# Altium PCB DB31.PcbDoc (part 2 of 8)
Units mil, origin at the board's own origin, x right, y up, seen from the top; angles counter-clockwise.
Board outline 3236.22 x 4456.69 mil, 8 copper layers (Top Layer, MidLayer1, MidLayer2, GND-Layer5, MidLayer3, VCC, MidLayer4, Bottom Layer), stack 61.8 mil thick; 226 components, 469 nets, 1815 pads, 1562 vias.
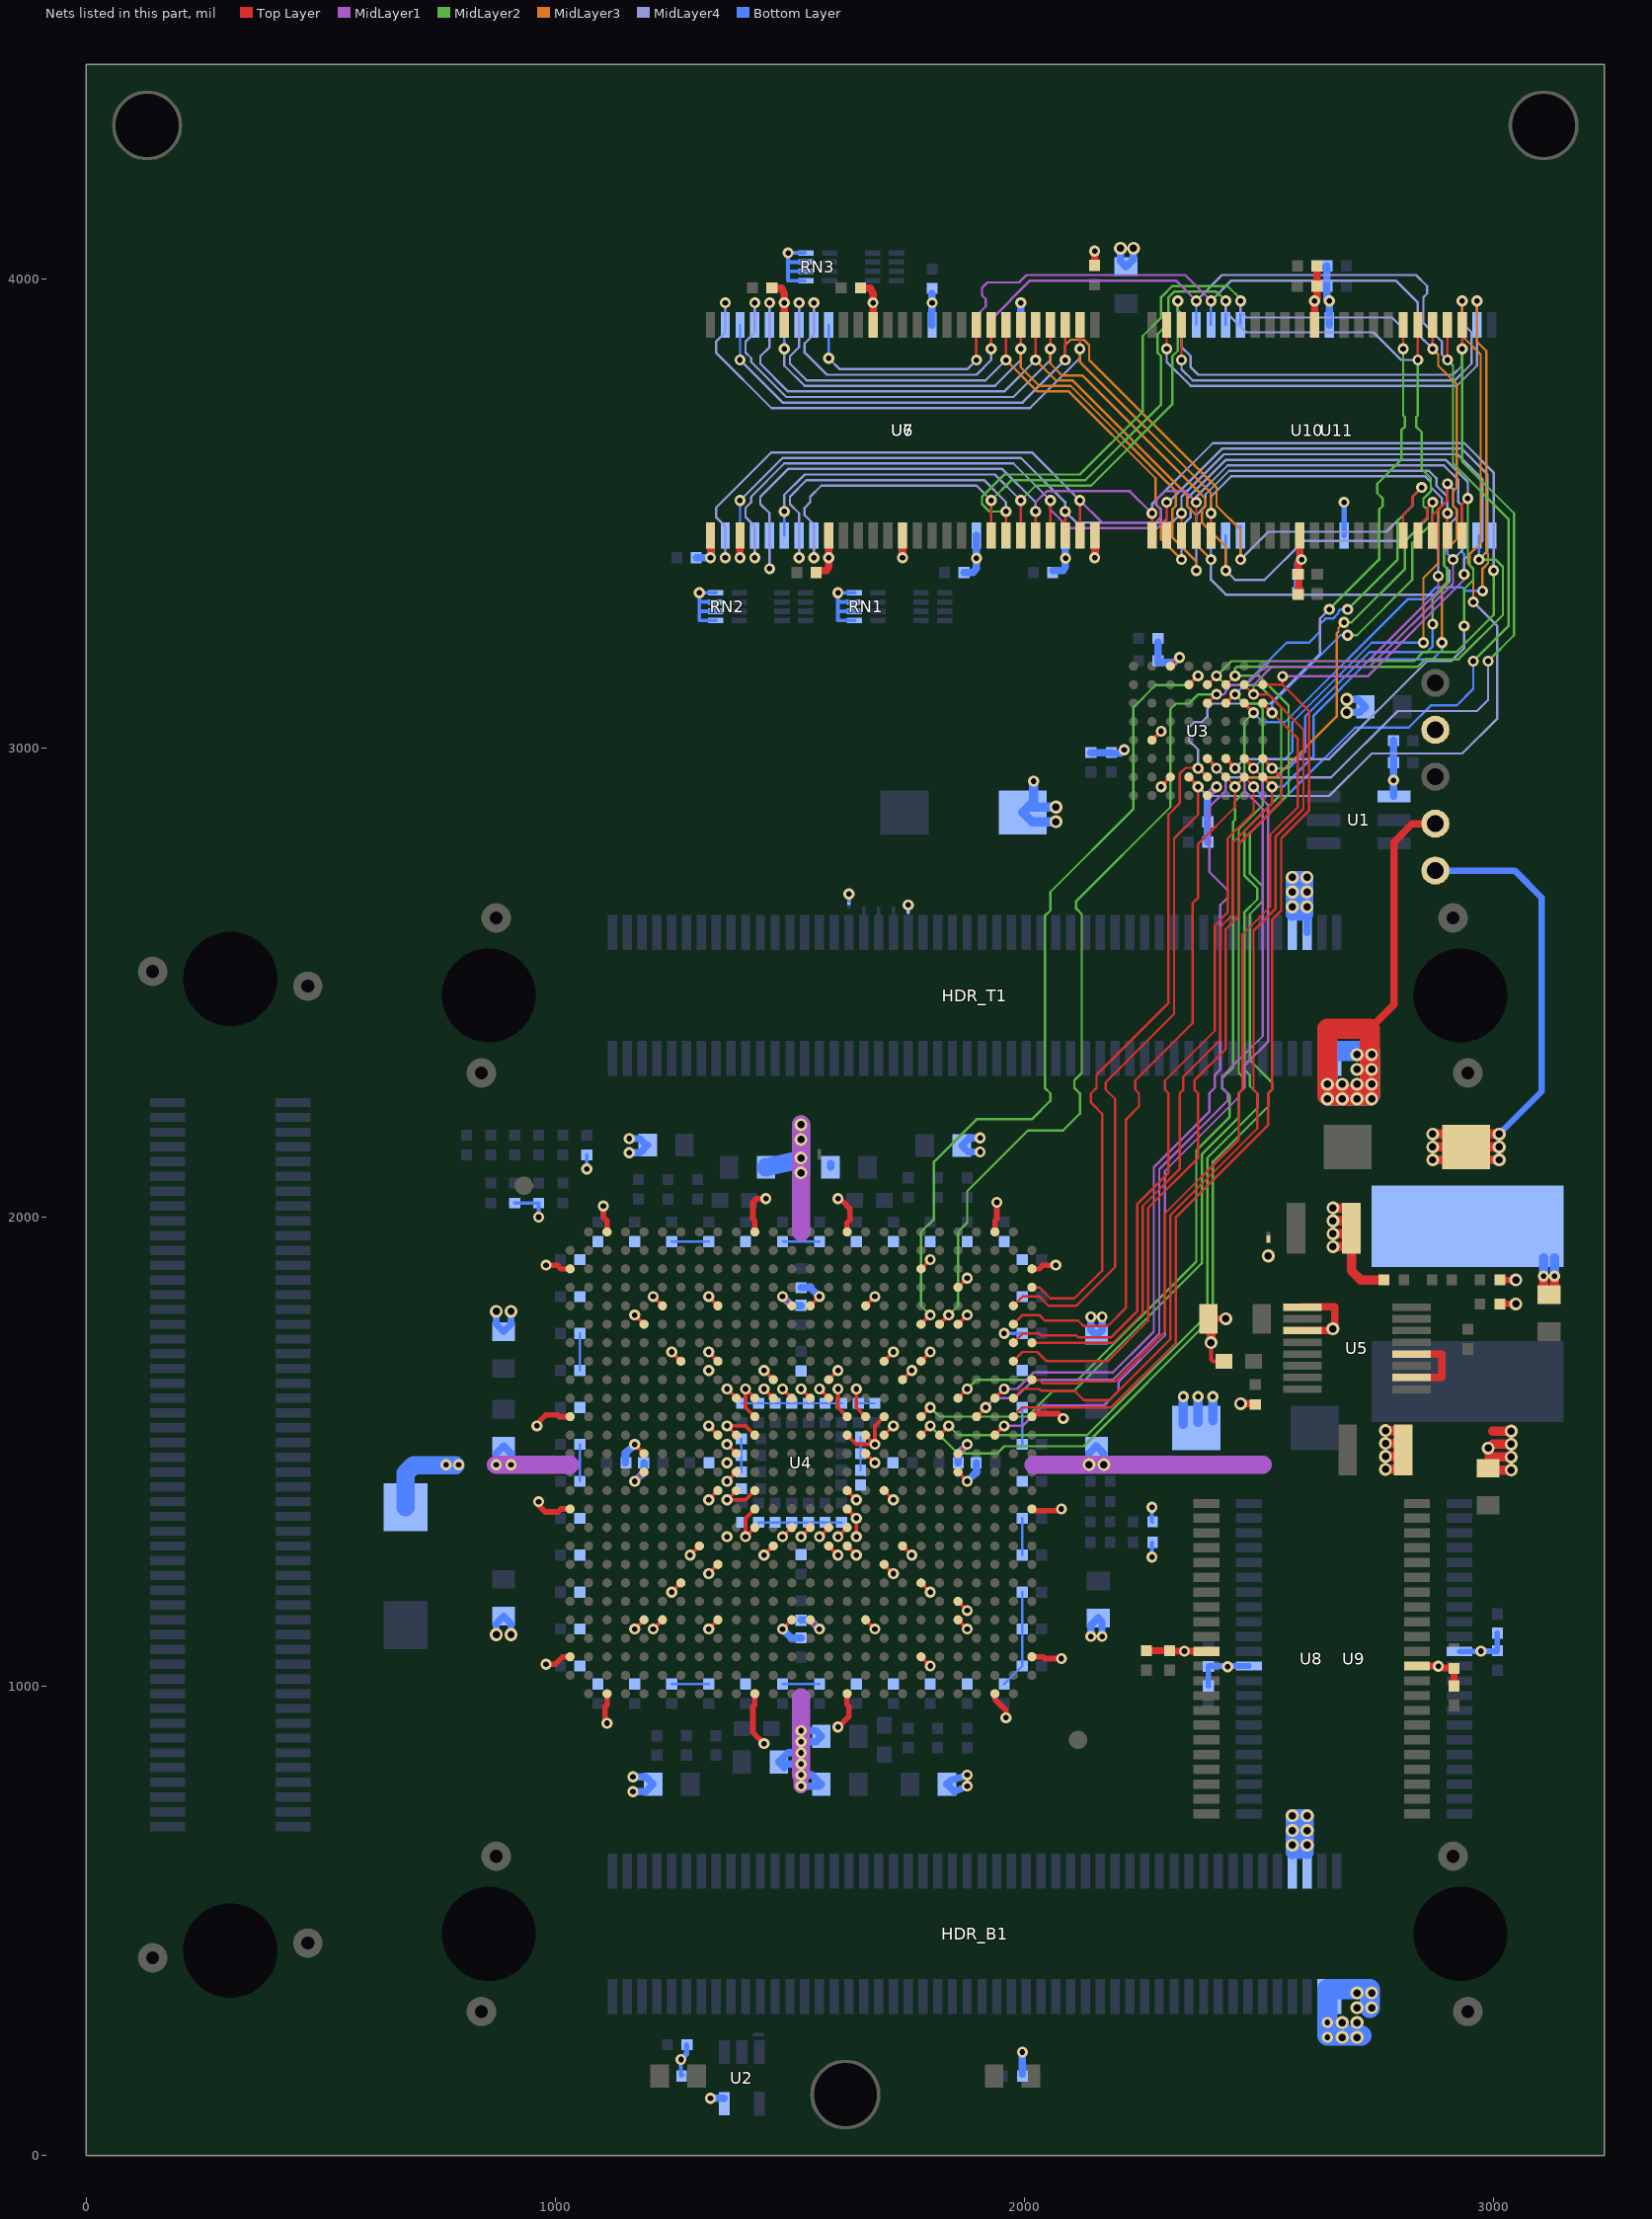
[diagram p8: the nets of this part, all layers, seen from the top]

## Part data
"Altium Logo Bot1" "Altium Logo Top1": library part D-000-0003, "Altium Logo for PCB"
C1 C7 C8 C9 C10 C11 C12 C13 C14 C15 C16 C17 C18 C19 C43 C44 C45 C46 C47 C48 C49 C50 C51 C52 C53 C54 C55 C56 C57 C58 C101 C102 C103 C107 C108 C112 C116 C120 C134 C135 C136 C137 C142 C143 C146 C147 C150 C151 C152 C153: library part D-101-0080, "Capacitor, Ceramic, 0.1uF 10% 16V 0402 (1005) X7R"
C2 C20 C21 C22 C23 C24 C25 C26 C27 C28 C29 C30 C31 C32 C33 C34 C59 C60 C61 C62 C63 C64 C65 C66 C67 C68 C69 C70 C71 C72 C73 C74 C75 C76 C77 C78 C79 C80 C81 C82 C83 C84 C85 C86 C87 C88 C89 C90 C91 C92 C93 C94 C95 C96 C97 C98 C104 C105 C106 C109 C113 C117 C121 C138 C139 C140 C141 C144 C145 C148 C149 C154 C155 C156 C157: library part D-101-0077, "Capacitor, Ceramic, 10nF 10% 16V 0402 (1005) X7R"
C3 C99 C100 C128: library part D-101-0088, "Capacitor, Tantalum, 220uF 10% 10V MCCT-D (7343-31)"
C4 C5 C6 C35 C36 C37 C38 C39 C40 C41 C42 C124 C125 C129 C131: library part D-101-0087, "Capacitor, Ceramic, 10uF 10% 10V 0805 (2012) X5R"
C110 C114 C118 C122: library part D-101-0030, "Capacitor, Ceramic, 1nF 10% 50V 0402 (1005) X7R"
C111 C115 C119 C123 C127: library part D-101-0095, "Capacitor, Ceramic, 2.2uF 10% 10V 0603 (1608) X5R"
C126: library part D-101-0069, "Capacitor, Ceramic, 470pF 5% 50V 0402 (1005) COG"
C130 C132: library part D-101-0021, "Capacitor, Ceramic, 22uF -20%/+80% 10V 1210 (3225) Y5V"
C133: library part D-101-0027, "Capacitor, Ceramic, 1uF 10% 25V 1206 (3216) X7R"
HDR_B1 HDR_L1 HDR_T1: library part D-300-0025, "Connector, Molex Docking Station 100 Pin Male 54075"
L1 L2 L3 L4: library part D-102-0002, "Inductor, Ferrite Bead 1K@100MHz 300mA 0805 (2012) BMB2A1000LN2"
L5: library part D-102-0004, "Inductor, 2.2uH, 15A, 4R2, SMD"
LED1: library part D-153-0004, "LED, Green 0805 (2012) KP-2012SGD"
LED2: library part D-153-0003, "LED, Red 0805 (2013) HSMH-C170"
MH1 MH2 MH3: library part D-001-0001, "Mounting Hole, M3 Screw, Plated, Square Pad"
NT1 NT2 NT3 NT4 NT5 NT6 NT7 NT8: library part D-002-0002, "Net-Tie, Surface Mount, 2 x 0.4mm x 0.2mm SMT Pads - For 0.2mm Track"
R1 R2: library part D-100-0111, "Resistor, 270R 1% 0402 (1005)"
R3 R4 R5 R8 R11: library part D-100-0088, "Resistor, 4K7 1% 0402 (1005)"
R6 R7 R9 R10 R12 R13 R14 R15 R16 R17 R18: library part D-100-0131, "Resistor, 100R 1% 0402 (1005)"
R19: library part D-100-0128, "Resistor, 10R 1% 0402 (1005)"
R20 R22: library part D-100-0105, "Resistor, 2K7 1% 0402 (1005)"
R21: library part D-100-0109, "Resistor, 27K 1% 0402 (1005)"
R23: library part D-100-0132, "Resistor, 100K 1% 0402 (1005)"
RN1 RN2 RN3 RN4 RN5 RN6: library part D-104-0001, "Resistor Network, Isolated, 4 x 100R, 5%, SMD 0402 x 4"
TP1 TP2 TP3 TP4 TP5: library part D-006-0000, "Test Point, PCB Mount with Silkscreen Box"
U1: library part D-263-0002, "Dual Addressable Switch Plus 1KB Memory"
U2: library part D-205-0001, "SN74LVC1G04DBV, Single Inverter Gate, 1.65-V to 5.5-V"
U3: library part D-262-0001, "S29GL256N11FFIV10, 256 Megabit (16M x 16) 3.0V Page Mode Flash Memory"
U4: library part D-241-0004, "FPGA, Altera Cyclone2-35 F672"
U5: library part D-204-0002, "MAX1831EEE, 3A, 1MHz, Low-Voltage, Step-Down Regulators with Synchronous Rectification and Internal Switches"
U6 U7: library part D-261-0000, "MT48LC16M16A2TG, 256 Mbit High-Speed CMOS SDRAM, 16Mb x 16Bit x 4 Banks, TSOP54"
U8 U9 U10 U11: library part D-260-0000, "K6R4016V1D-TC10T, 256K x 16-Bit SRAM, TSOP44"

## Via types
v1: diameter 23.62, hole 11.81, Top Layer to Bottom Layer, 947 vias
v2: diameter 23.62, hole 11.81, Top Layer to Bottom Layer, tented both sides, 476 vias
v3: diameter 27.56, hole 15.75, Top Layer to Bottom Layer, 138 vias
v4: diameter 23.62, hole 11.81, Top Layer to Bottom Layer, tented top, 1 vias

## Nets (pads, with @x,y where several pads share a name; then routed paths per layer and width w, separated by ;. In a path a pad name is that pad's centre, name@x,y a point inside that pad or via, vN(x,y) a via of type N, cw(c..) or ccw(c..) an arc to the next point about the centre after c; other vN are vias at no path point)
1V2: C3.1 C4.1 C5.1 C6.1 C7.1 C8.1 C9.1 C10.1 C11.1 C12.1 C13.1 C14.1 C15.1 C16.1 C17.1 C18.1 C19.1 C20.1 C21.1 C22.1 C23.1 C24.1 C25.1 C26.1 C27.1 C28.1 C29.1 C30.1 C31.1 C32.1 C33.1 C34.1 C128.1 C131.1 C132.1 L1.1 L2.1 L3.1 L4.1 L5.2 R20.1 TP5.1 U4.H7 U4.H20 U4.K10 U4.K11 U4.K12 U4.K13 U4.K14 U4.K15 U4.L11 U4.L16 U4.L17 U4.L18 U4.M10 U4.M11 U4.M16 U4.M17 U4.N10 U4.N17 U4.P10 U4.R10 U4.R11 U4.R16 U4.T11 U4.T16 U4.U11 U4.U13 U4.U14 U4.U15 U4.U16 U4.V16 U4.Y7 U4.Y20 | length 5461.1
  Top Layer w7.87: v1(1248.03,1200.78) U4.Y7@1267.72,1220.47 ; v1(1248.03,1712.6) U4.H7@1267.72,1692.91 ; v1(1366.14,1437.01) U4.P10@1385.83,1456.69 ; v1(1366.14,1515.75) U4.N10@1385.83,1496.06 ; v1(1366.14,1633.86) U4.K10@1385.83,1614.17 ; U4.R10@1385.83,1417.32 v1(1366.14,1397.64) 1405.51,1397.64 U4.R11@1425.2,1417.32 ; U4.M10@1385.83,1535.43 v1(1366.14,1555.12) 1405.51,1555.12 U4.M11@1425.2,1535.43 ; U4.U11@1425.2,1338.58 v1(1405.51,1318.9) 1405.51,1358.27 U4.T11@1425.2,1377.95 ; U4.L11@1425.2,1574.8 1405.51,1594.49 v1(1405.51,1633.86) U4.K11@1425.2,1614.17 ; v1(1444.88,1633.86) U4.K12@1464.57,1614.17 ; v1(1484.25,1318.9) U4.U13@1503.94,1338.58 ; v1(1484.25,1633.86) U4.K13@1503.94,1614.17 ; v1(1523.62,1318.9) U4.U14@1543.31,1338.58 ; v1(1523.62,1633.86) U4.K14@1543.31,1614.17 ; v1(1562.99,1318.9) U4.U15@1582.68,1338.58 ; v1(1562.99,1633.86) U4.K15@1582.68,1614.17 ; v1(1602.36,1318.9) U4.U16@1622.05,1338.58 ; v1(1602.36,1633.86) 1602.36,1594.49 U4.L16@1622.05,1574.8 ; U4.V16@1622.05,1299.21 v1(1641.73,1279.53) ; U4.T16@1622.05,1377.95 v1(1641.73,1358.27) v1(1641.73,1318.9) ; U4.R16@1622.05,1417.32 v1(1641.73,1397.64) ; U4.M16@1622.05,1535.43 1641.73,1515.75 v1(1681.1,1515.75) ; v1(1641.73,1633.86) 1641.73,1594.49 U4.L17@1661.42,1574.8 ; U4.N17@1661.42,1496.06 v1(1681.1,1476.38) ; U4.M17@1661.42,1535.43 v1(1681.1,1515.75) ; U4.L18@1700.79,1574.8 1681.1,1555.12 v1(1681.1,1515.75) ; U4.Y20@1779.53,1220.47 v1(1799.21,1200.78) ; U4.H20@1779.53,1692.91 v1(1799.22,1712.6)
  Top Layer w19.68: C132.1@2692.91,1976.37 C132.1@2694.88,1974.41 ; C132.1@2696.85,1948.82 2696.85,1976.37 2696.85,1885.83 2716.54,1866.14 R20.1@2766.21,1866.14 ; v3@2866.14,2122.05 C128.1@2913.39,2122.05 ; v3(2870.08,2149.61) C128.1@2937.01,2149.61 ; v3(2870.08,2177.17) C128.1@2937.01,2177.17 ; C128.1@2941.3,2122.05 v3(3011.81,2122.05) ; C128.1@2941.3,2149.61 v3(3011.81,2149.61) ; C128.1@2968.3,2122.05 C128.1@2941.02,2149.33 2968.86,2177.17 v3(3011.81,2177.17) ; C131.1@3106.3,1834.65 v1(3106.3,1874.02) ; C131.1@3129.92,1834.65 v1(3129.92,1874.02)
  Top Layer w20: v3(2657.47,1937) C132.1@2696.85,1937 ; v3(2657.47,1964.56) C132.1@2696.85,1964.56 ; v3(2657.47,1992.12) C132.1@2696.85,1992.12 ; v3(2657.47,2019.68) C132.1@2696.85,2019.68
  MidLayer1 w31.5: v1(1523.62,787.4) v1(1523.62,811.02)
  MidLayer1 w39.37: v1(874.02,1472.44) 1031.5,1472.44 ; v1(1523.62,811.02) 1523.62,976.38 ; 1523.62,1968.5 v3(1523.62,2196.85) ; 2019.68,1472.44 2507.87,1472.44
  Bottom Layer w5: C30.1@1396.65,1456.69 C18.1@1396.65,1492.12 C19.1@1396.65,1527.56 ; C7.1@1397.64,1603.34 C20.1@1433.07,1603.34 C8.1@1468.5,1603.34 C21.1@1503.93,1603.34 C9.1@1539.37,1603.34 C22.1@1574.8,1603.34 C10.1@1610.23,1603.34 ; C16.1@1433.07,1349.41 C28.1@1468.5,1349.41 C15.1@1503.93,1349.41 C27.1@1539.37,1349.41 C14.1@1574.8,1349.41 C26.1@1610.23,1349.41 ; C23.1@1645.67,1603.34 C11.1@1681.1,1603.34 ; C25.1@1650.59,1460.63 C12.1@1650.59,1496.06 C24.1@1650.59,1531.49
  Bottom Layer w13.78: TP5.1@2875.71,2738.67 3044.8,2738.67 3102.36,2681.1 3102.36,2625.98 3102.36,2267.72 v3(3011.81,2177.17)
  Bottom Layer w15.75: v1(874.02,1472.44) 874.02,1496.06 C4.1@889.76,1511.81 905.51,1496.06 v1(905.51,1472.44) ; L1.1@1488.18,826.77 L1.1@1476.38,838.58 1496.06,858.27 v1(1523.62,858.27) ; L1.1@1488.18,834.65 v1(1523.62,834.65) ; v3@1519.68,2122.05 v3(1523.62,2125.98) ; v1(1523.62,787.4) 1562.99,787.4 C5.1@1566.93,791.34 1547.24,811.02 v1(1523.62,811.02) ; v1(1523.62,881.89) 1555.12,881.89 L4.1@1566.93,893.7 1555.11,905.51 v1(1523.62,905.51) ; L2.1@1586.61,2106.29 L2.1@1586.61,2114.18 ; v3(2137.8,1472.44) 2137.8,1496.06 C6.1@2153.54,1511.81 2169.29,1496.06 v3(2169.29,1472.44)
  Bottom Layer w19.68: v1(3106.3,1874.02) L5.2@3106.3,1913.39 ; v1(3129.92,1874.02) L5.2@3129.92,1913.39
  Bottom Layer w20: C3.1@2338.59,1558.51 v1(2338.59,1617.56) ; C3.1@2370.08,1562.45 v1(2370.08,1617.56) ; C3.1@2401.58,1566.38 v1(2401.58,1617.56)
  Bottom Layer w39.37: L3.1@1448.82,2106.29 1517.6,2121.58 v3@1519.68,2122.05 ; v3(1523.62,2094.49) v3(1523.62,2196.85)
  other v1: 1366.14,1318.9 1366.14,1476.38 1326.77,1673.23
  other v3: 2870.08,2122.05 1523.62,2165.35
3V3: C1.2 C2.1 C35.1 C36.1 C37.1 C38.1 C39.1 C40.1 C41.1 C42.1 C43.1 C44.1 C45.1 C46.1 C47.1 C48.1 C49.1 C50.1 C51.1 C52.1 C53.1 C54.1 C55.1 C56.1 C57.1 C58.1 C59.1 C60.1 C61.1 C62.1 C63.1 C64.1 C65.1 C66.1 C67.1 C68.1 C69.1 C70.1 C71.1 C72.1 C73.1 C74.1 C75.1 C76.1 C77.1 C78.1 C79.1 C80.1 C81.1 C82.1 C83.1 C84.1 C85.1 C86.1 C87.1 C88.1 C89.1 C90.1 C91.1 C92.1 C93.1 C94.1 C95.1 C96.1 C97.1 C98.1 C99.1 C100.1 C101.2 C102.1 C103.1 C104.1 C105.1 C106.1 C107.1 C124.1 C125.1 C134.1 C135.1 C136.1 C137.1 C138.1 C139.1 C140.1 C141.1 C142.1 C143.1 C144.1 C145.1 C146.1 C147.1 C148.1 C149.1 C150.1 C151.1 C152.1 C153.1 C154.1 C155.1 C156.1 C157.1 HDR_B1.94 HDR_B1.96 HDR_T1.94 HDR_T1.96 NT1.2 NT4.2 R1.1 R2.1 R3.2 R4.2 R5.2 R8.2 R11.2 RN1.1 RN1.2 RN1.3 RN1.4 RN2.1 RN2.2 RN2.3 RN2.4 RN3.1 RN3.2 RN3.3 RN3.4 TP2.1 U1.4 U2.5 U3.D8 U3.F1 U3.F7 U3.G5 U4.A3 U4.A11 U4.A16 U4.A24 U4.AA22 U4.AB5 U4.AB6 U4.AB9 U4.AB13 U4.AB14 U4.AB17 U4.AB22 U4.AD1 U4.AD20 U4.AD26 U4.AF3 U4.AF11 U4.AF16 U4.AF24 U4.C1 U4.C20 U4.C26 U4.D22 U4.E6 U4.E9 U4.E13 U4.E14 U4.E17 U4.F5 U4.F22 U4.H9 U4.H18 U4.J12 U4.J15 U4.J19 U4.L1 U4.L26 U4.M9 U4.M18 U4.N5 U4.N22 U4.P5 U4.P22 U4.R9 U4.R18 U4.T1 U4.T26 U4.V8 U4.V12 U4.V15 U4.V19 U4.W9 U4.W18 U6.1 U6.3 U6.9 U6.14 U6.27 U6.43 U6.49 U7.1 U7.3 U7.9 U7.14 U7.27 U7.43 U7.49 U8.11 U8.33 U9.11 U9.33 U10.11 U10.33 U11.11 U11.33 | length 8907.4
  Top Layer w5: U6.9@1582.68,3433.07 U6.9@1582.68,3452.76
  Top Layer w7.87: v1(1169.29,1122.04) U4.AB5@1188.98,1141.73 ; v1(1169.29,1437.01) U4.P5@1188.98,1456.69 ; v1(1169.29,1515.75) U4.N5@1188.98,1496.06 ; v1(1169.29,1791.34) U4.F5@1188.98,1771.65 ; v1(1208.66,1122.04) U4.AB6@1228.35,1141.73 ; v1(1208.66,1830.71) U4.E6@1228.35,1811.02 ; v1(1287.4,1279.53) U4.V8@1307.09,1299.21 ; v1(1326.77,1122.04) U4.AB9@1346.46,1141.73 ; v1(1326.77,1240.16) U4.W9@1346.46,1259.84 ; v1(1326.77,1397.64) U4.R9@1346.46,1417.32 ; v1(1326.77,1555.12) U4.M9@1346.46,1535.43 ; v1(1326.77,1712.6) U4.H9@1346.46,1692.91 ; v1(1326.77,1830.71) U4.E9@1346.46,1811.02 ; v1(1444.88,1279.52) U4.V12@1464.57,1299.21 ; v1(1444.88,1673.23) U4.J12@1464.57,1653.54 ; v1(1484.25,1122.04) U4.AB13@1503.94,1141.73 ; v1(1484.25,1830.71) U4.E13@1503.94,1811.02 ; U4.AB14@1543.31,1141.73 v1(1562.99,1122.04) ; U4.E14@1543.31,1811.02 v1(1562.99,1830.71) ; U4.V15@1582.68,1299.21 v1(1602.36,1279.53) ; U4.J15@1582.68,1653.54 v1(1602.36,1673.23) ; U4.AB17@1661.42,1141.73 v1(1681.1,1122.04) ; U4.E17@1661.42,1811.02 v1(1681.1,1830.71) ; U4.W18@1700.79,1259.84 v1(1720.47,1240.16) ; U4.R18@1700.79,1417.32 v1(1720.47,1397.64) ; U4.M18@1700.79,1535.43 v1(1720.47,1555.12) ; U4.H18@1700.79,1692.91 v1(1720.47,1712.6) ; U4.V19@1740.16,1299.21 v1(1759.84,1279.53) ; U4.J19@1740.16,1653.54 v1(1759.84,1673.23) ; U4.AD20@1779.53,1062.99 v1(1799.21,1043.3) ; U4.C20@1779.53,1889.76 v1(1799.21,1909.45) ; U4.AB22@1858.27,1141.73 v1(1877.95,1122.04) ; U4.AA22@1858.27,1181.1 v1(1877.96,1161.41) ; U4.P22@1858.27,1456.69 v1(1877.96,1437.01) ; U4.N22@1858.27,1496.06 v1(1877.96,1515.75) ; U4.F22@1858.27,1771.65 v1(1877.96,1791.34) ; U4.D22@1858.27,1850.39 v1(1877.96,1870.08) ; U3.G5@2271.65,3016.73 v1(2291.34,3035.43) ; v1@2291.34,2918.31 U3.F7@2311.02,2937.99 ; U3.F1@2311.02,3174.21 v1@2330.71,3193.9 ; U3.D8@2389.76,2898.62 v1@2409.45,2918.31
  Top Layer w11.81: v1(960.63,1555.12) 960.63,1559.06 980.31,1578.74 1003.94,1578.74 1007.87,1574.8 U4.L1@1031.5,1574.8 ; v1(964.57,1393.7) 964.57,1385.83 978.72,1371.67 1005.53,1371.67 1011.81,1377.95 U4.T1@1031.5,1377.95 ; v1(980.31,1047.24) 1000,1047.24 1015.75,1062.99 U4.AD1@1031.5,1062.99 ; v1(980.31,1897.64) 1003.94,1897.64 1011.81,1889.76 U4.C1@1031.5,1889.76 ; v1(1102.36,2023.62) 1102.36,2000 1110.24,1992.13 U4.A3@1110.24,1968.5 ; v1(1110.24,921.26) 1106.3,925.2 1106.3,956.69 1110.24,960.63 U4.AF3@1110.24,984.25 ; U4.AF11@1425.2,984.25 1425.2,960.63 1421.26,956.69 1421.26,901.57 v1(1444.88,877.95) ; U4.A11@1425.2,1968.5 1425.2,1992.13 1421.26,1996.06 1421.26,2031.5 1429.13,2039.37 v1(1448.82,2039.37) ; v1(1602.36,2039.37) 1610.24,2035.43 1628.33,2017.34 1628.33,1994.47 1622.05,1988.19 U4.A16@1622.05,1968.5 ; v1@1602.85,912.89 1625.98,936.02 1625.98,956.69 1622.05,960.63 U4.AF16@1622.05,984.25 ; U4.AF24@1937.01,984.25 1937.01,972.44 1960.63,948.82 v1(1960.63,933.07) ; U4.A24@1937.01,1968.5 1937.01,1992.13 1940.94,1996.06 v1@1940.94,2026.56 ; U4.AD26@2015.75,1062.99 2039.37,1062.99 2043.31,1059.06 v1(2078.74,1059.06) ; U4.T26@2015.75,1377.95 2019.69,1374.02 2074.8,1374.02 v1(2078.74,1377.95) ; U4.L26@2015.75,1574.8 2022.03,1581.08 2072.46,1581.08 v1(2082.68,1570.87) ; U4.C26@2015.75,1889.76 2031.5,1889.76 2039.37,1897.64 v1(2066.93,1897.64)
  Top Layer w15: C145.1@2259.84,1075.78 C143.1@2309.14,1075.78 2309.92,1075 2343,1075 2343.2,1074.8 U8.33@2387.89,1074.8 ; U8.11@2836.71,1043.3 2885.83,1043.3 2889.76,1039.37 2914.45,1039.37 C142.1@2915.44,1038.38 C144.1@2915.44,1000.97 ; v1@2881.7,1043.3 v1(2882,1043)
  Top Layer w15.75: v2@1330.71,3409.45 U6.1@1330.71,3452.76 ; v2(1393.7,3405.51) U6.3@1393.7,3452.76 ; C138.1@1461.61,3980.31 1482.28,3980.32 1488.19,3968.51 ; U6.49@1488.19,3901.57 v2(1488.19,3948.82) ; v2@1488.19,3944.88 1488.19,3964.57 ; C135.1@1556.1,3377.95 1578.74,3377.95 1582.68,3385.83 1582.68,3389.76 1583.46,3401.52 1583.58,3403.35 v2@1583.66,3404.53 ; U6.9@1582.68,3452.76 v2@1582.68,3409.45 ; C139.1@1650.59,3980.31 1671.26,3980.32 1677.17,3968.51 v2@1677.17,3944.88 ; U6.43@1677.17,3901.57 v2(1677.17,3948.82) ; v2(1740.16,3405.51) U6.14@1740.16,3452.76 ; v2(2149.6,3405.52) U6.27@2149.61,3452.76 ; C134.1@2149.6,4028.54 v2(2149.61,4059.06) ; C154.1@2582.4,3371.05 C154.1@2583.38,3370.07 2583.38,3394.4 v2(2590.55,3401.57) 2586.61,3405.51 U10.11@2586.61,3452.76 ; C150.1@2584.37,3329.71 2584.37,3370.07 C154.1@2584.34,3370.23 ; U10.33@2618.11,3901.57 v2(2618.11,3952.76) 2623.03,3957.67 C151.1@2623.03,4027.55 ; v2@1582.68,3409.45 v2@1583.43,3405.66 ; v2@1582.68,3409.45 v2@1583.43,3405.66 ; v2@1583.43,3405.66 v2@1583.66,3404.53 ; v2@1583.43,3405.66 v2@1583.66,3404.53
  MidLayer4 w5: v3(2570.87,661.42) v3@2570.87,665.36
  Bottom Layer w5: C93.1@1052.17,1437.01 C94.1@1052.17,1515.75 ; C71.1@1052.17,1673.23 C67.1@1052.17,1751.97 ; C81.1@1248.03,1004.92 C80.1@1326.77,1004.92 ; C66.1@1248.03,1947.83 C64.1@1326.77,1947.83 ; C87.1@1484.25,1004.92 C84.1@1562.99,1004.92 ; C91.1@1484.25,1947.83 C98.1@1562.99,1947.83 ; C90.1@1956.7,1004.92 C88.1@1995.08,1043.31 C52.1@1995.08,1122.05 C54.1@1995.08,1200.79 ; C51.1@1995.08,1279.53 C97.1@1995.08,1358.27 ; C53.1@1995.07,1515.74 C58.1@1995.07,1594.49
  Bottom Layer w7.87: R11.2@913.38,2030 R4.2@964.56,2030 v1(964.57,2000) ; v1(1066.93,2102.36) R3.2@1066.93,2132.36 ; v1(1267.72,204.72) 1267.72,170.78 R1.1@1269.21,169.29 R1.1@1271.65,171.73 ; C101.2@1279.53,235.24 C101.2@1280.51,236.22 ; 1307.09,3291.34 RN2.2@1342.51,3291.34 ; 1307.09,3311.02 RN2.3@1342.51,3311.02 ; RN2.1@1342.51,3271.65 1307.09,3271.65 v1(1307.09,3330.71) RN2.4@1342.51,3330.71 ; U2.5@1359.25,122.05 U2.5@1360.23,123.03 ; 1496.07,4015.74 RN3.2@1531.49,4015.74 ; 1496.07,4035.43 RN3.3@1531.49,4035.43 ; RN3.1@1531.49,3996.06 1496.07,3996.06 v1(1496.07,4055.11) RN3.4@1531.49,4055.11 ; 1602.36,3291.34 RN1.2@1637.79,3291.34 ; 1602.36,3311.02 RN1.3@1637.79,3311.02 ; NT1.2@1625.98,2674.29 v2(1625.98,2688.98) ; RN1.1@1637.79,3271.65 1602.36,3271.65 v1(1602.36,3330.71) RN1.4@1637.79,3330.71 ; NT4.2@1751.97,2657.48 v2(1751.97,2665.35) ; v1@1877.95,807.08 v1(1877.95,811.02) ; v1(1956.7,1751.97) C56.1@1995.08,1751.97 ; v1(2271.65,1275.59) 2271.65,1305.59 R8.2@2273.15,1307.08 ; v1(2271.65,1381.89) 2271.65,1351.88 R5.2@2273.15,1350.39
  Bottom Layer w11.81: v1(1267.72,204.72) 1279.53,216.54 C101.2@1279.53,235.24 ; C146.1@2391.82,1000.97 C148.1@2391.82,1042.31 2392.81,1043.3 U9.11@2478.44,1043.3 ; v1(2433,1042) v1@2434.3,1043.3 ; U11.11@2681.1,3452.76 v2(2681.1,3523.62) ; U9.33@2927.25,1074.79 2972.79,1074.79 v1(2973,1075) 3007.08,1075 C149.1@3007.87,1075.79 C147.1@3007.87,1113.19
  Bottom Layer w15: v3(874.02,1110.24) 874.02,1133.86 C38.1@889.76,1149.6 905.51,1133.85 v3(905.51,1110.24) ; v3(874.02,1799.21) 874.02,1771.65 C36.1@889.76,1755.9 905.51,1771.65 v3(905.51,1799.21) ; v1(1157.6,2137.24) 1180.55,2137.24 C35.1@1196.85,2153.54 ; v1(1157.6,2167.24) 1180.06,2167.24 C35.1@1193.06,2154.24 ; v2(1165.35,775.59) 1192.91,775.59 C42.1@1208.66,791.34 1192.91,807.09 v2(1165.35,807.09) ; C41.1@1834.64,791.34 1850.39,775.59 v1(1877.95,787.4) ; v1(1905.51,2138.86) 1879.96,2138.84 C37.1@1866.26,2152.54 1882.57,2168.84 v1(1905.51,2168.86) ; C40.1@2157.48,1145.67 2165.35,1137.79 v1(2165.35,1106.3)
  Bottom Layer w15.75: C44.1@1149.6,1476.38 1149.6,1496.06 v1(1169.29,1515.75) ; v1(1169.29,1437.01) 1188.98,1456.69 C45.1@1188.98,1476.38 ; C136.1@1300.19,3405.5 v2(1330.71,3405.51) ; U7.27@1329.73,3437.99 U7.27@1330.71,3437.01 ; v1(1330.71,122.05) U2.5@1359.25,122.05 ; v2@1330.71,3404.53 U7.27@1330.71,3452.76 ; v1(1484.25,1122.04) 1503.94,1102.36 C43.1@1523.63,1102.36 ; v1(1484.25,1830.71) 1503.94,1811.02 C47.1@1523.63,1811.02 ; C48.1@1523.62,1141.73 1543.31,1141.73 v1(1562.99,1122.04) ; C49.1@1523.62,1850.4 1543.31,1850.4 v1(1562.99,1830.71) ; v2(1740.16,3405.51) U7.14@1740.16,3452.76 ; U7.43@1803.15,3901.57 C137.1@1803.15,3968.5 ; C41.1@1834.64,791.34 1842.52,799.21 v1(1877.95,811.02) ; C50.1@1858.27,1476.38 1858.27,1496.06 v1(1877.96,1515.75) ; C141.1@1871.06,3374.01 1889.76,3374.01 1897.64,3381.89 v2(1897.64,3404.53) 1897.64,3405.51 U7.9@1897.64,3452.76 ; v1(1877.96,1437.01) 1897.64,1456.69 C46.1@1897.64,1476.38 ; U7.49@1992.13,3901.57 v2(1992.13,3948.82) ; R2.1@1995.59,173.23 v1(1995.59,220.47) ; C140.1@2060.05,3377.95 2082.68,3377.95 2086.62,3385.83 2086.62,3389.76 U7.3@2086.61,3452.76 ; v2@2086.62,3409.45 v2(2087.6,3404.53) ; v1(2141.73,1106.3) 2141.73,1129.92 C40.1@2157.48,1145.67 ; v4(2141.73,1787.4) 2141.73,1759.83 C39.1@2153.54,1748.03 2165.35,1759.84 v1(2165.35,1787.4) ; C107.1@2141.73,2990.16 C104.1@2185.04,2990.16 2186.02,2989.18 2204.73,2989.18 v1(2212.6,2996.06) ; v2(2149.6,3405.52) 2149.61,3409.45 U7.1@2149.61,3452.76 ; v3(2204.72,4064.96) 2204.72,4037.4 C125.1@2216.53,4025.58 2232.28,4041.34 v3(2232.28,4064.96) ; C103.1@2284.45,3225.39 2284.45,3182.09 2318.9,3182.09 v1@2330.71,3193.9 ; C102.1@2390.74,2799.21 2389.76,2800.19 2389.76,2897.64 v1@2409.45,2917.33 ; C152.1@2581.69,3330.7 C156.1@2581.69,3370.07 2582.68,3371.06 2582.68,3393.7 v2(2590.55,3401.57) ; HDR_T1.96@2602.36,2606.3 2602.36,2645.67 ; C153.1@2641.73,4024.61 C153.1@2644.68,4027.55 2644.68,3957.68 v2(2649.61,3952.76) v2@2649.61,3956.7 ; U11.33@2649.88,3901.57 v2@2649.88,3944.88 ; v3(2687.01,3075.79) 2714.58,3075.79 C124.1@2726.38,3087.59 2710.63,3103.35 v3(2687.01,3103.35) ; U1.4@2786.42,2897.63 C1.2@2786.41,3015.74
  Bottom Layer w19.68: C100.1@2007.68,2874.02 v3(2066.93,2874.02) ; v1(2019.68,2929.13) 2019.68,2886.02 C100.1@1996.14,2862.47 2016.09,2842.52 v3(2066.93,2842.52)
  Bottom Layer w27.56: 2570.87,645.67 v3(2570.87,661.42) v3(2570.87,692.91) v3(2570.87,724.41) v3(2602.37,724.41) v3(2602.37,692.91) v3(2602.37,661.42) 2602.36,645.67 ; 2570.87,2645.67 v3(2570.87,2724.41) v3(2602.36,2724.41) 2602.36,2645.67 ; 2586.62,645.67 2586.62,724.41 ; 2586.61,2645.67 2586.61,2724.41
  Bottom Layer w39.37: C99.1@681.1,1381.89 681.1,1454.1 698,1471 v1@787.32,1471
  other v1: 1602.36,913.39 2341,1075 767.24,1472.44 794.02,1472.44 1940.94,2031.5 2291.34,2917.32 2409.45,2917.32 2330.71,3192.91
  other v2: 2786.42,2931.1 1582.68,3405.51 1803.15,3948.82
  other v3: 2570.87,2661.42 2602.36,2661.42 2570.87,2692.91 2602.36,2692.91
5V0: C129.1 C130.1 HDR_B1.97 HDR_B1.99 HDR_T1.97 HDR_T1.99 R19.1 TP4.1 U5.2 U5.4 | length 2295.6
  Top Layer w15.75: v3(2460.63,1602.36) 2490.62,1602.36 R19.1@2492.12,1600.86 ; 2728.35,2393.7 2787.4,2452.75 2787.4,2799.21 2826.86,2838.67 TP4.1@2875.71,2838.67 ; C130.1@2805.11,1505.9 2803.14,1503.93 C130.1@2818.89,1488.19 ; U5.2@2824.58,1658.25 2889.67,1658.25 2889.67,1708.25 U5.4@2824.58,1708.25 ; C129.1@2988.18,1464.56 v3(2988.19,1507.87)
  Top Layer w20: v3(2769.67,1462.59) C130.1@2809.04,1462.59 ; v3(2769.67,1490.15) C130.1@2809.04,1490.15 ; v3(2769.67,1517.71) C130.1@2809.04,1517.71 ; v3(2769.67,1545.27) C130.1@2809.04,1545.27 ; C129.1@2998.04,1461.1 v3(3037.41,1461.1) ; 2998.04,1488.66 v3(3037.41,1488.66) ; v3@2998.04,1516.22 v3(3037.41,1516.22) ; 2998.04,1543.78 v3(3037.41,1543.78)
  Top Layer w43.31: v3@2645.67,2259.84 2736.22,2259.84 2736.22,2401.57 2645.67,2401.58 v3@2645.67,2259.84
  Bottom Layer w43.31: 2649.61,263.78 v3@2677.17,263.78 ; v3@2716.54,255.91 2718.5,255.91 2708.66,255.91 2677.17,255.9 2645.67,255.9 2645.67,354.33 2736.22,354.33 2736.22,346.46 v3@2736.22,314.96 ; v3@2645.67,2259.84 2736.22,2259.84 2736.22,2283.47 2736.22,2314.96 2736.22,2346.46 2736.22,2354.33 2645.67,2354.33 v3@2645.67,2259.84
  other v1: 2645.67,251.97 2645.67,283.46
  other v3: 2677.17,251.97 2708.66,251.97 2677.17,283.46 2708.66,283.46 2708.66,314.96 2740.16,314.96 2708.66,346.46 2740.16,346.46 2645.67,2251.97 2677.17,2251.97 2708.66,2251.97 2740.16,2251.97 2645.67,2283.46 2677.17,2283.47 2708.66,2283.47 2740.16,2283.47 2708.66,2314.96 2740.16,2314.96 2708.66,2346.46 2740.16,2346.46
AGND: C127.2 C133.1 NT8.1 R22.2 R23.2 U5.9 U5.11 | length 426.1
  Top Layer w7.87: v3(2397.64,1732.28) 2397.64,1696.85 2401.58,1692.91 C127.2@2425.19,1692.91
  Top Layer w13.78: C133.1@2391.73,1783.46 v3(2429.13,1783.46) ; R23.2@3013.3,1814.96 v3(3047.24,1814.96) ; R22.2@3013.3,1866.14 v3(3047.24,1866.14)
  Top Layer w15.75: U5.9@2589.19,1808.68 2591.08,1808.69 2592.58,1808.69 2661.35,1808.87 2661.35,1808.76 ; U5.11@2591.08,1758.25 U5.11@2592.58,1758.25 2653.67,1758.25 v3(2657.19,1761.76) ; 2657.48,1808.76 2661.35,1808.76 ; v3@2661.35,1758.26 2661.35,1761.76 2661.35,1808.76
  Top Layer w19.68: v3(2397.64,1732.28) 2397.64,1777.55 C133.1@2391.73,1783.46 C133.1@2397.64,1789.37
  other v3: 2519.68,1917.32
BUS_A1: U3.E2 U4.F20 | length 1790.5
  Top Layer w7.87: U4.F20@1779.53,1771.65 v1(1799.22,1791.34) ; U3.E2@2350.39,3134.84 v1(2370.08,3153.55)
  MidLayer2 w5: v1(1799.22,1791.34) 1779.53,1811.02 1779.53,1866.14 1779.53,1968.52 1807.09,1996.07 1807.09,2031.49 1807.09,2039.37 1807.09,2118.11 1897.64,2208.66 2015.75,2208.66 2055.12,2248.03 2055.12,2263.78 2043.31,2275.59 2043.31,2641.73 2055.12,2653.54 2055.12,2692.91 2232.28,2870.08 2232.28,3086.61 2279.53,3133.86 2350.39,3133.86 v1(2370.08,3153.55)
BUS_A2: U3.D2 U4.M21 U6.23 U7.23 U10.1 U11.1 | length 5430.9
  Top Layer w5: U6.23@2023.62,3452.76 v2(2023.62,3503.93) ; U10.1@2271.65,3452.76 v1(2271.65,3500) ; U3.D2@2389.76,3134.84 2390.75,3134.85 v1(2409.45,3153.54)
  Top Layer w7.87: U4.M21@1818.9,1535.43 v1(1838.59,1555.12)
  MidLayer1 w5: v2(2023.62,3503.93) 2023.62,3523.62 2047.24,3547.24 2224.41,3547.24 v1(2271.65,3500)
  MidLayer2 w5: v1(1838.59,1555.12) 1858.27,1535.43 1929.14,1535.43 2078.74,1535.43 2090.55,1535.43 2133.86,1535.43 2389.76,1791.34 2389.76,2125.98 2496.06,2232.28 2496.06,2263.78 2480.31,2279.53 2480.31,2303.15 2468.5,2314.96 2468.5,2649.61 2496.06,2677.17 2496.06,2700.79 2468.5,2728.35 2468.5,2822.83 2547.24,2901.57 2547.24,3086.61 2500,3133.86 2429.13,3133.86 v1(2409.45,3153.54) 2440.94,3185.04 2830.71,3185.04 2850.39,3204.72 2921.26,3204.72 3000,3283.46 v1(3000,3377.95)
  MidLayer4 w5: v2(1456.69,3381.89) 1456.69,3500 1437.01,3519.68 1437.01,3535.43 1496.06,3594.49 1952.75,3594.49 2023.62,3523.63 v2(2023.62,3503.93) ; v1(2271.65,3500) 2271.65,3519.69 2401.57,3649.61 2937.39,3649.61 3000,3587 v1(3000,3377.95)
  Bottom Layer w5: v2(1456.69,3381.89) U7.23@1456.69,3452.76 ; v1(3000,3377.95) U11.1@3000,3452.76
BUS_A3: U3.C2 U4.M20 U6.24 U7.24 U10.2 U11.2 | length 5538.2
  Top Layer w5: U6.24@2055.12,3452.76 v2(2055.11,3527.55) ; U10.2@2303.15,3452.76 v1(2303.15,3523.62) ; U3.C2@2429.13,3134.84 2430.12,3134.85 v1(2448.82,3153.54)
  Top Layer w7.87: U4.M20@1779.53,1535.43 v1(1799.22,1555.12)
  MidLayer1 w5: v2(2055.11,3527.55) 2055.12,3507.87 2094.49,3468.5 2283.46,3468.5 2303.15,3488.19 v1(2303.15,3523.62)
  MidLayer2 w5: v1(1799.22,1555.12) 1858.27,1496.06 1913.39,1496.06 1940.95,1496.06 1956.7,1511.81 2078.74,1511.81 2090.55,1511.81 2125.98,1511.81 2401.57,1787.4 2401.57,2118.11 2519.68,2236.22 2519.68,2263.78 2527.56,2271.65 2527.56,2287.4 2480.31,2334.65 2480.31,2645.67 2507.87,2673.23 2507.87,2704.72 2480.31,2732.28 2480.31,2755.91 ; 2480.31,2744.09 2480.31,2818.9 2562.99,2901.57 2562.99,3090.55 2500,3153.54 v1(2448.82,3153.54) 2448.82,3169.29 2452.76,3173.23 2838.58,3173.23 2854.33,3188.98 2925.2,3188.98 3019.68,3283.46 3019.68,3385.83 3003.94,3401.57 v1(2968.5,3401.57)
  MidLayer4 w5: v2(1425.2,3405.51) 1425.2,3472.44 1405.51,3492.13 1405.51,3511.81 1417.32,3523.62 1417.32,3535.43 1488.19,3606.3 1976.37,3606.3 v2(2055.11,3527.55) ; v1(2303.15,3523.62) 2307.09,3523.62 2421.26,3637.8 2932.21,3637.79 2987,3583 2987,3420.07 v1(2968.5,3401.57)
  Bottom Layer w5: v2(1425.2,3405.51) U7.24@1425.2,3452.76 ; v1(2968.5,3401.57) U11.2@2968.5,3452.76
BUS_A4: U3.A2 U4.L25 U6.25 U7.25 U10.3 U11.3 | length 4788.4
  Top Layer w5: U4.L25@1976.38,1574.8 1996.07,1594.49 2078.74,1594.49 2090.55,1594.49 2185.04,1594.49 2322.83,1732.28 2322.83,2000 2519.68,2196.85 2519.68,2263.78 2527.56,2271.65 2527.56,2633.86 2547.24,2653.54 2547.24,2763.78 ; U6.25@2086.61,3452.76 v2(2086.61,3503.93) ; U10.3@2334.64,3452.76 v1(2334.64,3500) ; U3.A2@2507.87,3134.84 2550.19,3134.85 ; 2547.24,2748.03 2547.24,2807.09 2606.3,2866.14 2606.3,3078.74 2550.19,3134.85 ; v1(2550.19,3152.55) 2550.19,3134.85
  MidLayer1 w5: v1(2550.19,3152.55) 2731.29,3152.55 2937.01,3358.27 v1(2937.01,3370.08)
  MidLayer4 w5: v2(1393.7,3527.56) 1484.25,3618.11 1992.62,3618.11 2086.61,3524.12 v2(2086.61,3503.93) 2110.23,3480.32 2314.96,3480.32 v1(2334.64,3500) 2334.64,3535.43 2425.19,3625.98 2923.02,3625.98 2976,3573 2976,3441 2937.01,3402.01 v1(2937.01,3370.08)
  Bottom Layer w5: U7.25@1393.7,3452.76 v2(1393.7,3527.56) ; U11.3@2933.07,3452.76 U11.3@2933.07,3430.12 ; v1(2937.01,3370.08) 2937.01,3377.95 2937.01,3413.39 2933.07,3417.32 U11.3@2933.07,3430.12 ; U11.3@2937.01,3434.05 U11.3@2933.07,3430.12
BUS_A5: U3.B2 U4.K25 U6.26 U7.26 U10.4 U11.4 | length 4962.3
  Top Layer w5: U4.K25@1976.38,1614.17 1996.06,1633.86 2031.5,1633.86 2035.43,1629.92 2078.74,1629.92 2090.55,1629.92 2106.3,1629.92 2125.98,1610.24 2181.1,1610.24 2311.02,1740.16 2311.02,2003.94 2496.06,2188.98 2496.06,2263.78 2488.19,2271.65 2488.19,2610.24 2535.43,2657.48 2535.43,2767.72 ; U6.26@2118.11,3452.76 v2(2118.11,3527.55) ; U10.4@2366.14,3452.76 v1(2366.14,3523.62) ; U3.B2@2468.5,3134.84 2468.51,3133.86 v1(2488.19,3114.17) 2519.69,3114.17 2594.49,3039.37 2594.49,2870.08 2535.43,2811.02 2535.43,2755.91
  MidLayer1 w5: v2(2118.11,3527.55) 2165.34,3480.32 2279.53,3480.32 2291.34,3492.13 2291.34,3507.87 2281.65,3517.56 2281.65,3529.68 2299.21,3547.24 2342.52,3547.24 v1(2366.14,3523.62) ; v1(2488.19,3114.17) 2488.19,3133.86 2527.56,3173.23 2736.22,3173.23 2913.39,3350.39 v1(2913.39,3401.57)
  MidLayer4 w5: v2(1362.2,3405.51) 1362.2,3472.44 1342.52,3492.13 1342.52,3511.81 1460.63,3629.92 2015.74,3629.92 v2(2118.11,3527.55) ; v1(2366.14,3523.62) 2366.14,3535.43 2433.07,3602.36 2893.7,3602.36 2924.7,3571.36 2924.7,3524.11 2933.07,3515.75 2933.07,3421.26 v1(2913.39,3401.57)
  Bottom Layer w5: v2(1362.2,3405.51) U7.26@1362.2,3452.76 ; U11.4@2905.51,3448.82 U11.4@2901.57,3452.76 2901.57,3413.39 v1(2913.39,3401.57)
BUS_A6: U3.D3 U4.F21 U6.29 U7.29 U10.5 U11.5 | length 4761.4
  Top Layer w5: v2(2118.1,3850.39) U6.29@2118.11,3901.57 ; U10.5@2397.64,3452.76 v1(2397.64,3500)
  Top Layer w7.87: U4.F21@1818.9,1771.65 v1(1838.59,1791.34) ; U3.D3@2389.77,3095.48 v1(2409.45,3114.18)
  MidLayer1 w5: v1(2409.45,3114.18) 2425.2,3114.18 2429.13,3118.11 2429.13,3122.05 2440.94,3133.86 2472.44,3133.86 2523.62,3185.04 2732.28,3185.04 2881.89,3334.65 v1(2881.89,3366.14)
  MidLayer2 w5: v1(1838.59,1791.34) 1858.27,1811.03 1858.27,1866.14 1858.27,1968.51 1877.95,1988.19 1877.95,2031.5 1877.95,2039.37 1877.95,2055.12 2007.87,2185.04 2082.68,2185.04 2118.11,2220.47 2118.11,2263.78 2106.3,2275.59 2106.3,2291.34 2122.05,2307.09 2122.05,2645.67 2110.24,2657.48 2110.24,2673.23 2311.02,2874.02 2311.02,3082.68 2322.83,3094.49 2350.39,3094.49 2370.08,3114.18 v1(2409.45,3114.18)
  MidLayer3 w5: v2(2118.1,3850.39) 2118.11,3822.84 2397.64,3543.31 v1(2397.64,3500)
  MidLayer4 w5: v2(1362.2,3948.82) 1362.2,3885.83 1342.52,3866.14 1342.52,3842.52 1460.63,3724.41 2011.81,3724.41 2118.1,3830.7 v2(2118.1,3850.39) ; v1(2397.64,3500) 2397.64,3535.93 2440.45,3578.74 2854.33,3578.74 2866.14,3566.93 2866.14,3555.86 2889.76,3532.24 2889.76,3515.75 2881.89,3507.87 v1(2881.89,3366.14)
  Bottom Layer w5: U7.29@1362.2,3901.59 v2(1362.2,3948.82) ; U11.5@2870.08,3452.76 2870.08,3433.07 2881.89,3421.26 v1(2881.89,3366.14)
BUS_A7: U3.C3 U4.L20 U6.30 U7.30 U10.18 U11.18 | length 4996.7
  Top Layer w5: v2(2086.61,3826.77) U6.30@2086.61,3901.57 ; U10.18@2807.09,3452.76 2807.09,3496.06 2826.77,3515.75 2826.77,3535.43 v1(2846.46,3555.12)
  Top Layer w7.87: U4.L20@1779.53,1574.8 v1(1799.22,1594.49) ; U3.C3@2429.14,3095.48 v1(2448.82,3114.17)
  MidLayer2 w5: v1(1799.22,1594.49) 1818.9,1574.8 2005.91,1574.8 2061.03,1629.92 2078.74,1629.92 2090.55,1629.92 2106.3,1629.92 2377.95,1901.57 2377.95,2133.86 2456.69,2212.6 2456.69,2263.78 2468.5,2275.59 2468.5,2295.28 2456.69,2307.09 2456.69,2826.77 2507.87,2877.95 2507.87,3082.68 2496.06,3094.49 2468.5,3094.49 v1(2448.82,3114.17) ; v1(2688.98,3295.28) 2795.28,3401.57 2795.28,3484.25 2826.77,3515.75 2826.77,3535.43 v1(2846.46,3555.12)
  MidLayer3 w5: v2(2086.61,3826.77) 2086.61,3858.26 2098.43,3870.08 2125.98,3870.08 2137.8,3858.27 2137.8,3826.77 2409.45,3555.12 2409.45,3515.75 2460.63,3464.57 v2(2460.63,3401.57)
  MidLayer4 w5: v2(1393.7,3826.77) 1484.25,3736.22 1996.06,3736.22 v2(2086.61,3826.77) ; v2(2460.63,3401.57) 2519.68,3460.63 2771.65,3460.63 2826.77,3515.75 2826.77,3535.43 v1(2846.46,3555.12)
  Bottom Layer w5: v2(1393.7,3826.77) U7.30@1393.7,3901.57 ; v1(2448.82,3114.17) 2559.06,3224.41 2606.3,3224.41 2610.24,3228.35 2629.92,3248.03 2629.92,3263.78 2641.73,3275.59 2657.48,3275.59 2669.29,3287.4 2669.29,3291.34 2673.23,3295.28 v1(2688.98,3295.28) ; v2(2460.63,3401.57) U11.18@2460.63,3452.76 U11.18@2460.63,3472.44
BUS_A8: U3.A3 U4.J26 U6.31 U7.31 U10.19 U11.19 | length 4743.7
  Top Layer w5: U4.J26@2015.75,1653.54 2031.5,1653.54 2039.37,1645.67 2078.74,1645.67 2090.06,1645.67 2114.17,1645.67 2118.11,1649.61 2192.91,1649.61 2299.21,1755.91 2299.21,2007.87 2456.69,2165.35 2456.69,2263.78 2464.57,2271.65 2464.57,2602.36 2523.62,2661.42 2523.62,2814.96 2582.68,2874.02 2582.68,3019.68 v1(2527.56,3074.8) ; v2(2055.11,3850.39) U6.31@2055.12,3901.57 ; U10.19@2838.58,3452.76 2838.58,3472.44 2858.27,3492.13 2858.27,3511.81 v1(2870.08,3523.62)
  Top Layer w7.87: U3.A3@2507.88,3095.48 v1(2527.56,3074.8)
  MidLayer2 w5: v1(2688.98,3240.16) 2708.66,3240.16 2826.77,3358.27 2826.77,3366.14 2826.77,3437.01 2870.08,3480.31 v1(2870.08,3523.62)
  MidLayer3 w5: v2(2055.11,3850.39) 2055.11,3818.9 2080.55,3793.46 2123.86,3793.46 2370.08,3547.24 2385.83,3531.5 2385.83,3515.28 2385.36,3515.28 2377.95,3507.87 2377.95,3480.32 2429.13,3429.13 v1(2429.13,3377.95)
  MidLayer4 w5: v2(1425.2,3948.82) 1425.2,3885.83 1421.26,3881.89 1405.51,3866.14 1405.51,3842.52 1417.32,3830.71 1417.32,3822.83 1492.13,3748.03 1976.38,3748.03 2055.11,3826.77 v2(2055.11,3850.39) ; v1(2429.13,3377.95) 2448.82,3358.27 2511.81,3358.27 2594.49,3440.94 2811.02,3440.94 2858.27,3488.19 2858.27,3511.81 v1(2870.08,3523.62)
  Bottom Layer w5: U7.31@1425.2,3901.57 v2(1425.2,3948.82) ; v1(2429.13,3377.95) U11.19@2429.13,3452.76 ; v1(2527.56,3074.8) 2527.56,3094.49 2673.23,3240.16 v1(2688.98,3240.16)
BUS_A9: U3.B6 U4.M24 U6.32 U7.32 U10.20 U11.20 | length 5180.4
  Top Layer w5: v2(2023.62,3826.77) U6.32@2023.62,3901.57 ; U10.20@2870.08,3452.76 2870.08,3496.06 2901.57,3527.56 v1(2901.57,3562.99)
  Top Layer w7.87: U4.M24@1937.01,1535.43 v1(1956.7,1555.12) ; U3.B6@2468.5,2977.36 v1@2488.19,2957.68
  MidLayer1 w5: v1(1956.7,1555.12) 1996.07,1555.12 2039.37,1598.43 2078.74,1598.43 2090.55,1598.43 2169.29,1598.43 2200.79,1629.92 2200.79,1649.61 2299.21,1748.03 2299.21,2098.43 2457.07,2256.28 2457.07,2263.4 2456.69,2263.78 2468.5,2275.59 2468.5,2322.83 2519.68,2374.02 2519.68,2732.28 ; v1@2488.19,2957.68 2488.68,2957.19 2507.87,2938 2507.87,2937.01 2507.88,2889.75 2519.66,2877.98 2519.69,2708.66
  MidLayer3 w5: v2(2023.62,3826.77) 2066.93,3783.46 2102.36,3783.46 2122.05,3763.78 2346.46,3539.37 2346.46,3515.75 2366.14,3496.06 2366.14,3433.07 v2(2397.64,3401.57) ; v1(2850.39,3224.41) 2850.39,3362.2 2881.89,3393.7 2881.89,3507.87 2901.57,3527.56 ; 2901.57,3527.56 v1(2901.57,3562.99)
  MidLayer4 w5: v2(1456.69,3948.82) 1456.69,3854.33 1437.01,3834.65 1437.01,3818.9 1496.06,3759.84 1956.69,3759.84 v2(2023.62,3826.77) ; v2(2397.64,3401.57) 2397.64,3358.27 2429.13,3326.77 2877.95,3326.77 2905.51,3354.33 2905.51,3377.95 2893.7,3389.76 2893.7,3464.57 2921.26,3492.13 2921.26,3507.87 2913.39,3515.75 2913.39,3551.18 v1(2901.57,3562.99)
  Bottom Layer w5: U7.32@1456.69,3901.57 v2(1456.69,3948.82) ; v2(2397.64,3401.57) U11.20@2397.64,3452.76 ; v1(2488.19,2956.69) 2507.87,2976.38 2555.12,2976.38 2570.87,2992.13 2570.87,3055.12 2740.16,3224.41 v1(2850.39,3224.41)
BUS_A10: U3.A6 U4.H25 U6.33 U7.33 U10.21 U11.21 | length 4762.6
  Top Layer w5: U4.H25@1976.38,1692.91 1996.06,1712.6 2027.56,1712.6 2047.24,1692.91 2078.74,1692.91 2090.55,1692.91 2177.17,1692.91 2263.78,1779.53 2263.78,2019.69 2370.08,2125.98 2370.08,2263.78 2362.2,2271.65 2362.2,2291.34 2429.13,2358.27 2429.13,2614.17 2456.69,2641.73 2456.69,2752.14 ; v2(1992.12,3850.39) U6.33@1992.13,3901.57 ; 2456.69,2740.16 2456.69,2795.27 2547.24,2885.83 2547.24,2937.01 v1(2527.56,2956.69) v1@2527.56,2957.68 ; U10.21@2901.57,3452.76 v1(2901.57,3500)
  Top Layer w7.87: U3.A6@2507.87,2977.36 v1@2527.56,2957.68
  MidLayer2 w5: v1(2870.08,3263.78) 2870.08,3318.9 2901.57,3350.39 2901.57,3381.89 2893.7,3389.76 2893.7,3468.5 2901.57,3476.38 v1(2901.57,3500)
  MidLayer3 w5: v2(1992.12,3850.39) 1992.12,3811.03 2031.5,3771.65 2098.43,3771.65 2322.83,3547.24 2322.83,3515.75 2314.96,3507.87 2314.96,3448.82 2366.14,3397.64 v1(2366.14,3377.95)
  MidLayer4 w5: v2(1488.19,3850.39) 1488.19,3814.96 1531.5,3771.65 1937.01,3771.65 1992.12,3826.77 v2(1992.12,3850.39) ; v1(2366.14,3377.95) 2366.14,3496.06 2385.36,3515.28 2385.83,3515.28 2385.83,3540.11 2436.27,3590.55 2862.2,3590.55 2877.95,3574.8 2877.95,3559.06 2901.57,3535.43 v1(2901.57,3500)
  Bottom Layer w5: v2(1488.19,3850.39) U7.33@1488.19,3901.57 ; v1(2366.14,3377.95) U11.21@2366.14,3452.76 ; v1(2527.56,2956.69) 2562.99,2956.69 2598.43,2992.13 2598.43,3066.93 2736.22,3204.72 2858.27,3204.72 2870.08,3216.54 v1(2870.08,3263.78)
BUS_A11: U3.C6 U4.L23 U6.34 U7.34 U10.22 U11.22 | length 5084.9
  Top Layer w5: v2(1960.62,3826.77) U6.34@1960.63,3901.57 ; U10.22@2933.07,3452.76 2933.07,3519.68 v1(2944.88,3531.5)
  Top Layer w7.87: U4.L23@1897.64,1574.8 v1(1917.33,1594.49) ; U3.C6@2429.13,2977.36 v1@2448.82,2957.68
  MidLayer1 w5: v1(1917.33,1594.49) 1937.01,1614.17 1980.32,1614.17 2019.69,1653.54 2078.74,1653.54 2090.55,1653.54 2188.98,1653.54 2287.4,1751.97 2287.4,2102.36 2433.07,2248.03 2433.07,2263.78 2421.26,2275.59 2421.26,2299.21 2507.87,2385.83 2507.87,2870.08 2468.51,2909.44 2468.51,2937.99 2449.31,2957.19 v1@2448.82,2957.68
  MidLayer2 w5: v1(2937.01,3259.84) 2937.01,3338.58 2952.76,3354.33 2956.69,3358.27 2956.69,3381.89 2944.88,3393.7 v1(2944.88,3531.5)
  MidLayer3 w5: v2(1960.62,3826.77) 2027.56,3759.84 2094.49,3759.84 2279.53,3574.8 2279.53,3519.68 2291.34,3507.87 2291.34,3444.88 v2(2334.65,3401.57)
  MidLayer4 w5: v2(1519.68,3948.82) 1519.68,3854.33 1500,3834.65 1500,3818.9 1535.43,3783.46 1917.32,3783.46 v2(1960.62,3826.77) ; v2(2334.65,3401.57) 2334.65,3472.44 2354.33,3492.13 2354.33,3507.87 2346.46,3515.75 2346.46,3531.5 2429.13,3614.17 2897.64,3614.17 2944.88,3566.93 v1(2944.88,3531.5) ; v1(2448.82,2956.69) 2468.5,2976.38 2649.61,2976.38 2858.27,3185.04 2909.45,3185.04 2937.01,3212.6 v1(2937.01,3259.84)
  Bottom Layer w5: U7.34@1519.68,3901.57 v2(1519.68,3948.82) ; v2(2334.65,3401.57) U11.22@2334.65,3452.76
BUS_A12: U3.D6 U4.K24 U6.22 U7.22 U10.23 U11.23 | length 5508.6
  Top Layer w5: U6.22@1992.13,3452.76 v2(1992.12,3527.55) ; v2(2933.07,3850.39) U10.23@2933.07,3901.57
  Top Layer w7.87: U4.K24@1937.01,1614.17 v1(1956.7,1633.86) ; U3.D6@2389.76,2977.36 v1@2409.45,2957.68
  MidLayer1 w5: v1(1956.7,1633.86) 1984.25,1633.86 2019.69,1669.29 2078.74,1669.29 2090.55,1669.29 2188.98,1669.29 2259.84,1740.16 ; 2204.72,1685.04 2275.59,1755.91 2275.59,2106.3 2393.7,2224.41 2393.7,2263.78 2405.51,2275.59 2405.51,2303.15 2417.32,2314.96 2417.32,2665.35 2433.07,2681.1 2433.07,2696.85 2393.7,2736.22 2393.7,2874.02 2429.14,2909.46 2429.14,2937 v1(2409.45,2956.69) 2409.45,2957.68 v1@2409.94,2957.19
  MidLayer2 w5: v2(1992.12,3527.55) 2023.62,3559.06 2141.73,3559.06 2314.96,3732.28 2314.96,3834.64 2326.77,3846.46 v2(2326.77,3952.76) ; v2(2933.07,3850.39) 2933.07,3610.24 3043.31,3500 3043.31,3240.16 v1(2988.19,3185.04)
  MidLayer4 w5: v2(1488.19,3503.94) 1488.19,3539.37 1531.5,3582.68 1937,3582.68 v2(1992.12,3527.55) ; v2(2326.77,3952.76) 2326.77,3933.07 2334.65,3925.2 2334.65,3854.33 2354.33,3834.65 2354.33,3811.02 2370.08,3795.28 2913.39,3795.28 2933.07,3814.96 v2(2933.07,3850.39) ; v1(2409.45,2956.69) 2429.13,2937.01 2653.54,2937.01 2795.28,3078.74 2964.57,3078.74 2988.19,3102.36 v1(2988.19,3185.04)
  Bottom Layer w5: U7.22@1488.19,3452.76 v2(1488.19,3503.94) ; v2(2326.77,3952.76) 2326.77,3929.13 2334.65,3921.26 U11.23@2334.65,3901.57
BUS_A13: U3.B7 U4.G25 U6.35 U7.35 U10.24 U11.24 | length 4999
  Top Layer w5: v2(1929.13,3850.39) U6.35@1929.13,3901.57 ; U4.G25@1976.38,1732.28 1996.06,1751.97 2031.5,1751.97 2035.43,1748.03 2078.74,1748.03 2090.55,1748.03 2110.24,1748.03 2114.17,1744.09 2185.04,1744.09 2240.16,1799.21 2240.16,2027.56 2307.09,2094.49 2307.09,2263.78 2299.21,2271.65 2299.21,2290.85 2405.51,2397.14 2405.51,2622.05 2433.07,2649.61 2433.07,2756.79 ; 2433.07,2740.16 2433.07,2807.09 2488.19,2862.21 2488.19,2918.31 U3.B7@2468.5,2937.99 ; v2(2901.57,3826.77) U10.24@2901.57,3901.57
  MidLayer1 w5: v2(1929.13,3850.39) 1929.13,3913.39 2011.81,3996.06 2322.83,3996.06 v2(2366.14,3952.76)
  MidLayer2 w5: v2(2901.57,3826.77) 2913.39,3814.96 2913.39,3606.3 3031.5,3488.19 3031.5,3259.84 v1(2956.69,3185.04)
  MidLayer4 w5: v2(1551.18,3948.82) 1551.18,3881.89 1531.5,3862.2 1531.5,3842.52 1578.74,3795.28 1897.64,3795.28 1929.13,3826.77 v2(1929.13,3850.39) ; v2(2366.14,3952.76) 2421.26,4007.87 2834.65,4007.87 2858.27,3984.25 2858.27,3968.5 2850.39,3960.63 2850.39,3905.51 2889.76,3866.14 2889.76,3838.58 v2(2901.57,3826.77)
  Bottom Layer w5: U7.35@1551.18,3881.89 U7.35@1551.18,3901.57 v2(1551.18,3948.82) ; U11.24@2366.14,3901.57 v2(2366.14,3952.76) ; v1(2488.19,2917.32) 2507.87,2897.64 2559.06,2897.64 2704.72,3043.31 2818.9,3043.31 2866.14,3090.55 2921.26,3090.55 2956.69,3125.98 v1(2956.69,3185.04)
BUS_A14: U3.A7 U4.G26 U6.36 U7.36 U10.25 U11.25 | length 4618.6
  Top Layer w5: v2(1897.63,3826.77) U6.36@1897.64,3901.57 ; U4.G26@2015.75,1732.28 2078.74,1732.28 2090.55,1732.28 2188.98,1732.28 2251.97,1795.28 2251.97,2023.62 2330.71,2102.36 2330.71,2263.78 2338.58,2271.65 2338.58,2299.21 2417.32,2377.95 2417.32,2618.11 2444.88,2645.67 2444.88,2754.47 ; 2444.88,2744.09 2444.88,2799.21 2527.56,2881.89 v1(2527.56,2917.32) v1@2527.56,2918.31 ; v2(2870.08,3850.39) U10.25@2870.08,3901.57
  Top Layer w7.87: U3.A7@2507.87,2937.99 v1@2527.56,2918.31
  MidLayer1 w5: v2(1897.63,3826.77) 1897.64,3921.26 1917.32,3940.94 1917.32,3956.69 1909.45,3964.57 1909.45,3980.32 1921.26,3992.13 1988.19,3992.13 2003.94,4007.87 2342.52,4007.87 v2(2397.64,3952.76)
  MidLayer3 w5: v2(2870.08,3850.39) 2881.89,3838.58 2881.89,3814.96 2921.26,3775.59 2921.26,3555.12 2913.39,3547.24 2913.39,3515.75 2921.26,3507.87 2921.26,3444.88 2893.7,3417.32 2893.7,3389.76 2901.57,3381.89 2901.57,3354.33 2889.76,3342.52 v1(2889.76,3224.41)
  MidLayer4 w5: v2(1582.68,3830.71) 1606.3,3807.09 1877.95,3807.09 v2(1897.63,3826.77) ; v2(2397.64,3952.76) 2440.94,3996.06 2791.34,3996.06 2838.58,3948.82 2838.58,3881.89 v2(2870.08,3850.39)
  Bottom Layer w5: v2(1582.68,3830.71) U7.36@1582.68,3901.57 ; U11.25@2397.64,3901.57 v2(2397.64,3952.76) ; v1(2527.56,2917.32) 2551.18,2917.32 2616.5,2982.65 2616.5,3069.26 2736.22,3188.98 2870.08,3188.98 2889.76,3208.66 v1(2889.76,3224.41)
BUS_A15: U3.C7 U4.F25 U6.20 U7.20 U10.26 U11.26 | length 4766.8
  Top Layer w5: U6.20@1929.13,3452.76 v2(1929.13,3527.55) ; U4.F25@1976.38,1771.65 1996.06,1791.34 2031.5,1791.34 2043.31,1779.53 2078.74,1779.53 2090.55,1779.53 2114.17,1779.53 2125.98,1767.72 2177.17,1767.72 2216.54,1807.09 2216.54,2208.66 2244.09,2236.22 2244.09,2263.78 2236.22,2271.65 2236.22,2291.34 2358.27,2413.39 2358.27,2669.29 2370.08,2681.1 2370.08,2795.28 2448.82,2874.02 v1(2448.82,2917.32) 2448.82,2918.31 U3.C7@2429.13,2937.99 ; v2(2838.58,3826.77) U10.26@2838.58,3901.57
  MidLayer2 w5: v2(1929.13,3527.55) 1972.44,3570.87 2129.92,3570.87 2291.34,3732.28 2291.34,3834.65 2283.46,3842.52 2283.46,3881.89 2293.31,3891.73 2307.09,3905.51 2307.09,3960.63 2318.9,3972.44 2409.45,3972.44 v2(2429.13,3952.76) ; v1(2681.1,3267.72) 2696.85,3267.72 2811.02,3381.89 2811.02,3440.94 2858.27,3488.19 2858.27,3507.87 2850.39,3515.75 2850.39,3531.5 2866.14,3547.25 2866.14,3574.8 2846.46,3594.49 2846.46,3673.23 2834.64,3685.04 2834.64,3704.72 2838.58,3708.66 v2(2838.58,3826.77)
  MidLayer3 w5: v1(2448.82,2917.32) 2468.5,2937.01 2535.43,2937.01 2665.35,3066.93 2665.35,3244.09 2669.29,3248.03 2669.29,3255.91 v1(2681.1,3267.72)
  MidLayer4 w5: v2(1551.18,3405.51) 1551.18,3476.38 1531.5,3496.06 1531.5,3511.81 1543.31,3523.62 1543.31,3535.43 1566.93,3559.06 1897.63,3559.06 v2(1929.13,3527.55) ; v2(2429.13,3952.76) 2429.13,3929.13 2472.44,3885.83 2744.09,3885.83 2803.15,3826.77 v2(2838.58,3826.77)
  Bottom Layer w5: v2(1551.18,3405.51) U7.20@1551.18,3452.76 ; U11.26@2429.13,3901.57 v2(2429.13,3952.76)
BUS_A16: U3.D7 U4.D26 U6.21 U7.21 U10.27 U11.27 | length 4815.6
  Top Layer w5: U6.21@1960.63,3452.76 v2(1960.63,3503.93) ; U4.D26@2015.75,1850.39 2031.49,1850.39 2055.12,1826.77 2078.74,1826.77 2090.55,1826.77 2106.3,1826.77 2165.35,1885.83 2165.35,2220.47 2141.73,2244.09 2141.73,2263.78 2153.54,2275.59 2153.54,2303.15 2307.09,2456.69 2307.09,2858.27 2330.71,2881.89 2330.71,2944.88 2343.51,2957.68 v1@2370.08,2957.68 ; v2(2807.09,3850.39) U10.27@2807.09,3901.57
  Top Layer w7.87: v1@2370.08,2957.68 2370.57,2957.19 U3.D7@2389.76,2937.99
  MidLayer2 w5: v2(1960.63,3503.93) 1925.2,3503.93 1909.45,3519.68 1909.45,3535.43 1925.2,3551.18 1956.69,3582.68 2118.11,3582.68 2251.97,3716.54 2251.97,3877.95 2291.34,3917.32 2291.34,3960.63 2314.96,3984.25 2433.07,3984.25 2460.63,3956.69 v2(2460.63,3952.76) ; v1(2649.61,3295.28) 2755.91,3401.57 2755.91,3507.87 2763.78,3515.75 2763.78,3531.5 2751.97,3543.31 2751.97,3562.99 2803.15,3614.17 2803.15,3677.17 2811.02,3685.04 2811.02,3704.72 2807.09,3708.66 v2(2807.09,3850.39)
  MidLayer4 w5: v2(1519.68,3405.51) 1519.68,3500 1500,3519.68 1500,3535.43 1535.43,3570.87 1913.38,3570.87 1960.63,3523.63 v2(1960.63,3503.93) ; v1(2370.08,2956.69) 2370.08,2996.06 2350.39,3015.75 2350.39,3043.31 2362.2,3055.12 2377.95,3055.12 2389.76,3066.93 2389.76,3082.68 2401.57,3094.49 2523.62,3094.49 2629.92,3200.79 2629.92,3275.59 v1(2649.61,3295.28) ; v2(2460.63,3952.76) 2460.63,3929.13 2472.44,3917.32 2783.46,3917.32 2807.09,3893.7 v2(2807.09,3850.39)
  Bottom Layer w5: v2(1519.68,3405.51) U7.21@1519.68,3452.76 ; U11.27@2460.63,3901.57 v2(2460.63,3952.76)
BUS_A17: U3.E7 U4.E25 U10.42 U11.42 | length 3994
  Top Layer w5: U4.E25@1976.38,1811.02 1996.06,1830.71 2031.5,1830.71 2051.18,1811.02 2078.74,1811.02 2090.55,1811.02 2110.24,1811.02 2192.91,1893.7 2192.91,2251.97 2173.23,2271.65 2173.23,2287.4 2318.9,2433.07 2318.9,2807.09 2370.08,2858.27 v1(2370.08,2917.32) ; v2(2334.64,3826.77) U10.42@2334.64,3901.57
  Top Layer w7.87: U3.E7@2350.39,2937.99 v1(2370.08,2917.32)
  MidLayer3 w5: v2(2933.07,3952.76) 2933.07,3877.95 2972.44,3838.58 2972.44,3437.01 2948.82,3413.39 2948.82,3389.76 2956.69,3381.89 v1(2956.69,3311.02)
  MidLayer4 w5: v2(2334.64,3826.77) 2334.64,3807.09 2358.27,3783.46 2917.32,3783.46 2952.76,3818.9 2952.76,3885.83 2933.07,3905.51 v2(2933.07,3952.76) ; v1(2370.08,2917.32) 2389.76,2897.64 2649.61,2897.64 2740.16,2988.19 2933.07,2988.19 3007.87,3062.99 3007.87,3259.84 v1(2956.69,3311.02)
  Bottom Layer w5: U11.42@2933.07,3901.57 v2(2933.07,3952.76)
BUS_A18: U3.B3 U4.K22 U10.43 U11.43 | length 4110
  Top Layer w5: v2(2303.15,3850.39) U10.43@2303.15,3901.57 ; v1(2488.19,3074.8) v1@2488.19,3075.8
  Top Layer w7.87: U4.K22@1858.27,1614.17 v1(1877.96,1633.86) ; U3.B3@2468.5,3095.47 v1@2488.19,3075.79
  MidLayer2 w5: v1(1877.96,1633.86) 1897.64,1653.54 2078.74,1653.54 2090.55,1653.54 2114.17,1653.54 2366.14,1905.51 2366.14,2141.73 2437.01,2212.6 2437.01,2259.84 2421.26,2275.59 2421.26,2295.28 2444.88,2318.9 2444.88,2673.23 2444.88,2842.52 2448.82,2846.46 2448.82,2885.83 2468.5,2905.51 2468.5,2976.38 2468.5,3055.12 v1(2488.19,3074.8)
  MidLayer3 w5: v2(2964.57,3952.76) 2964.57,3866.14 2984.25,3846.46 2984.25,3417.32 2988.19,3413.39 2988.19,3393.7 2976.38,3381.89 v1(2976.38,3334.65)
  MidLayer4 w5: v2(2303.15,3850.39) 2303.15,3822.83 2354.33,3771.65 2921.26,3771.65 2964.57,3814.96 v2(2964.57,3952.76)
  Bottom Layer w5: v1(2488.19,3074.8) 2507.87,3055.12 2555.12,3055.12 2816.68,3316.68 2852.11,3316.68 2877.95,3342.52 2933.07,3342.52 2940.94,3334.65 v1(2976.38,3334.65) ; U11.43@2964.57,3901.57 v2(2964.57,3952.76)